# Altium PCB PCB1 p-1.PcbDoc
Units mil, origin at the board's own origin, x right, y up, seen from the top; angles counter-clockwise.
Board outline 1800 x 1800 mil, 2 copper layers (Top Layer, Bottom Layer); 3 components, 3 nets, 6 pads, 0 vias.
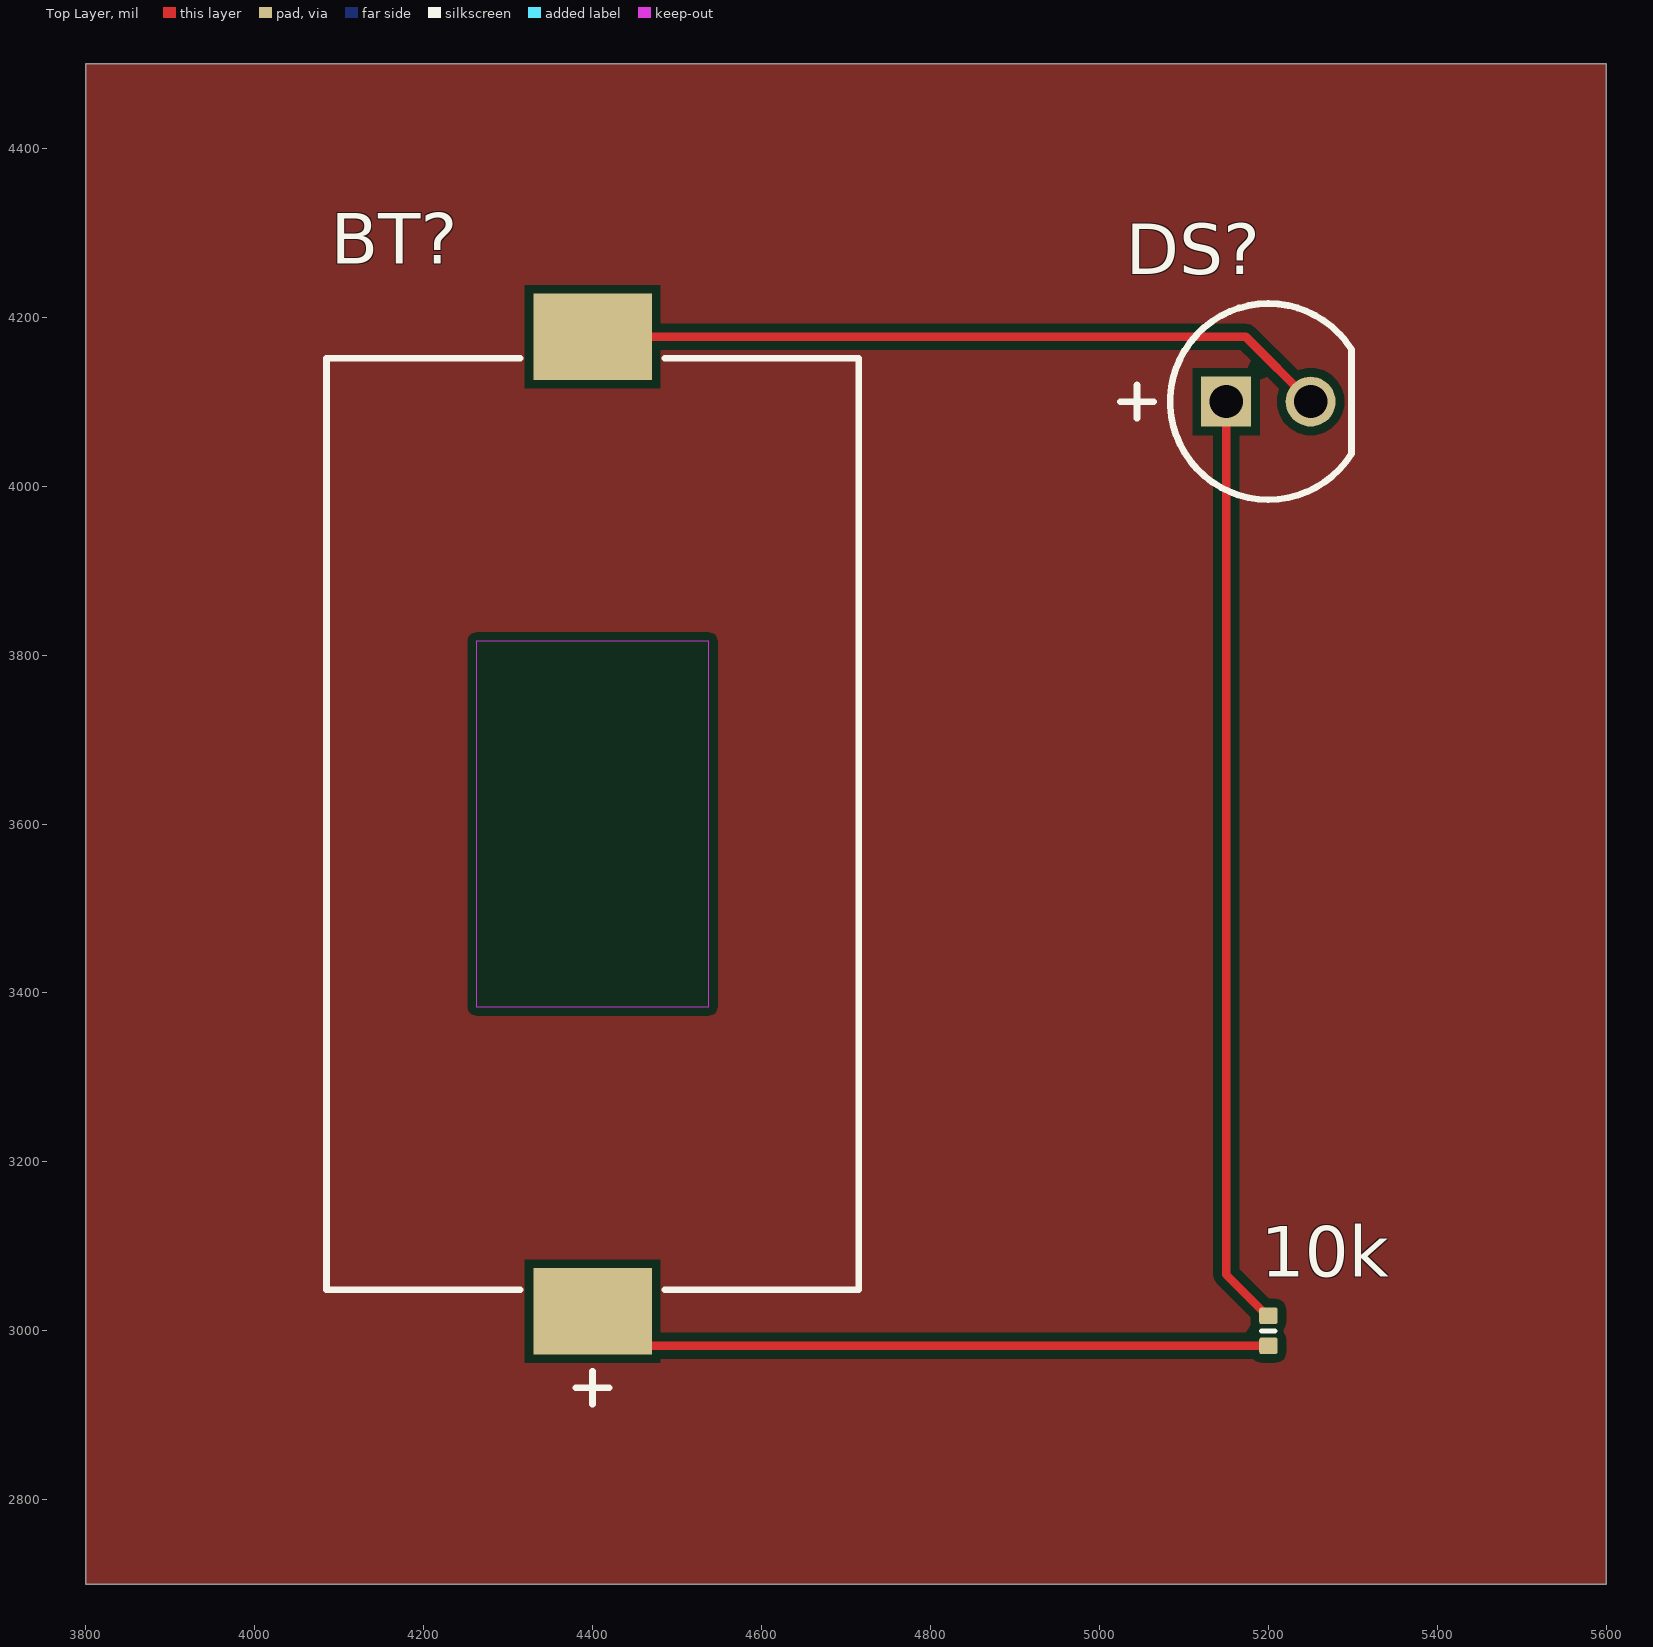
[diagram p0: Top Layer view]
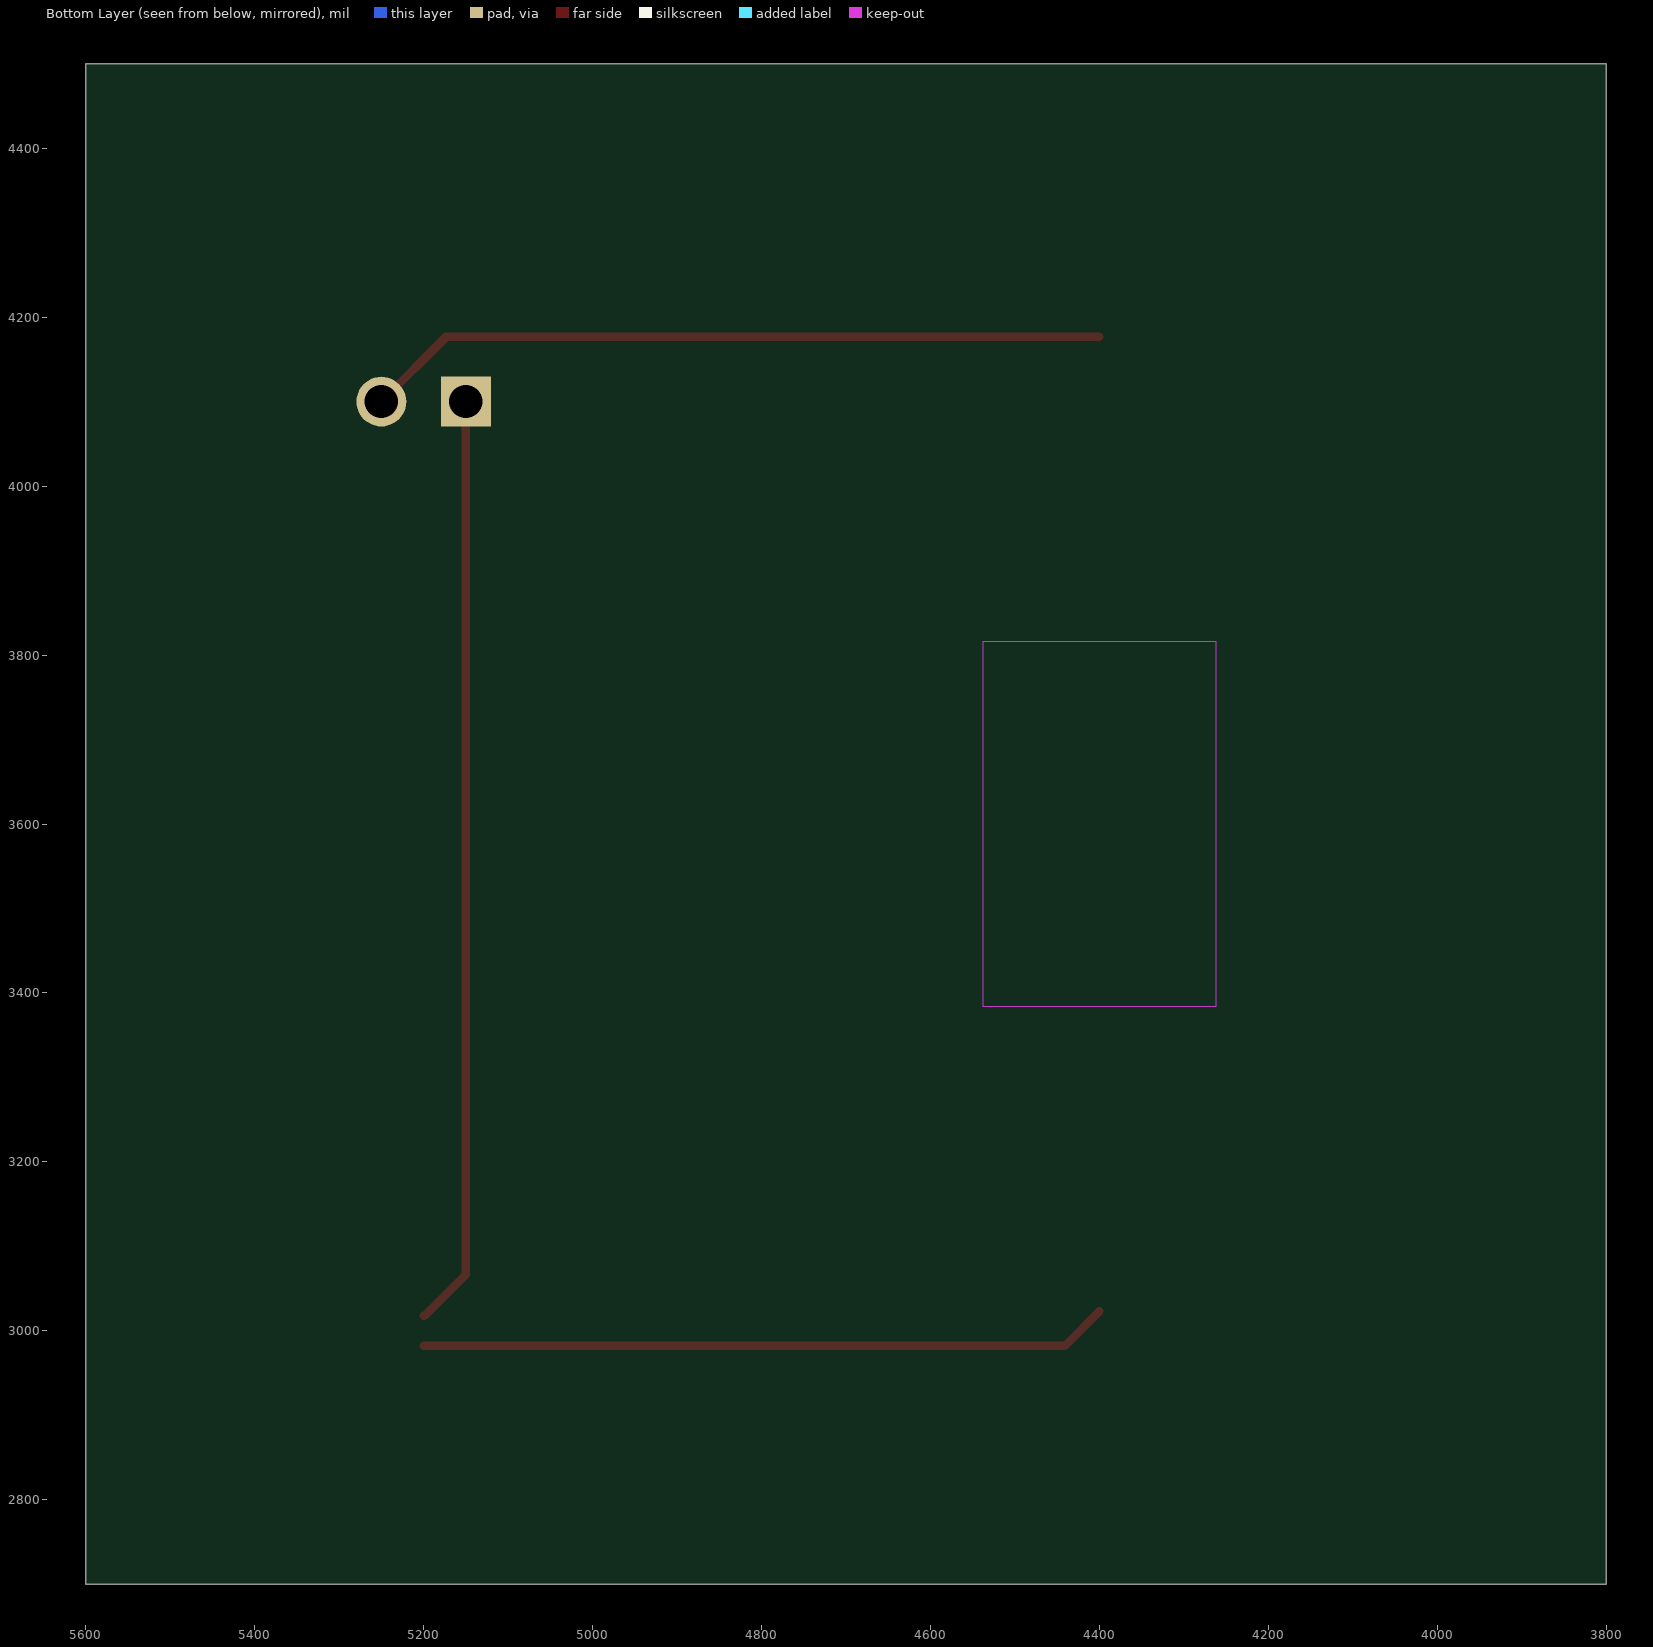
[diagram p1: Bottom Layer view, seen from below]

## Layer stack, top to bottom
Top Solder: solder mask 0.4, Solder Resist, Dk 3.5
Top Layer: signal copper 1.4
Dielectric 1: dielectric 12.6, FR-4, Dk 4.8
Bottom Layer: signal copper 1.4
Bottom Solder: solder mask 0.4, Solder Resist, Dk 3.5

## Board outline
3800,2700 5600,2700 5600,4500 3800,4500

## Design rules (kind name [scope] priority, off if disabled: settings)
Clearance [All] p1: gap=10 ignorepadtopadclearanceinfootprint=FALSE
PolygonConnect [All] p1: connectstyle=Relief reliefconductorwidth=10 reliefentries=4 polygonreliefangle="90 Angle" airgapwidth=10
RoutingVias [All] p1: holewidth=28 width=50 viastyle="Through Hole" minholewidth=28 minwidth=50 maxholewidth=28 maxwidth=50
SolderMaskExpansion [All] p1: expansion=0 istentingtop=FALSE
Width [All] p1: maxlimit=10 minlimit=10 preferedwidth=10
30 further rules are at their usual default settings.

## Components (designator, comment, footprint, x,y, rotation, side; value= is the part's Value field where it differs from the comment)
10k "Resistor 187K +/-1 % 0402 63 mW" RESC0402(1005)_L 5200,3000 r90 top value=187k
BT? "BA2032SM" MPD-BA2032SM_V 4400,3600 r90 top
DS? "G502DC" CGX-G502DC 5200,4100 r0 top

## Footprints (in the part's own frame and the unit in brackets; to place one, negate y for a bottom-side part, rotate by r counter-clockwise, add the part's x,y. Pads: shape width x height; smd on the part's side, far side on the other; paste and mask are expansions set on the pad)
CGX-G502DC [mm] "THD, 2-Leads, Dia 5.9mm, Pin Spacing 2.54mm"
  rect 1.5x1.5 hole 1: 1(-1.27,0)
  round 1.5 hole 1: 2(1.27,0)
  silkscreen extent -4.45,-2.95 2.5,2.95, body extent -2.95,-2.95 2.5,2.95, height 9.1
MPD-BA2032SM_V [mm] "Coin Cell Holder, 2-Leads, Body 28x16mm"
  rect 2.6x3.56 smd: 1(-14.65,0) 2(14.65,0)
  Keep-Out Layer region: -5.5,-3.5 5.5,-3.5 5.5,3.5 -5.5,3.5
  silkscreen extent -17.45,-8 14,8, body extent -14,-8 14,8, height 6.7
RESC0402(1005)_L [mm] "Chip Resistor, Body 1.0x0.5mm, IPC High Density"
  rrect25% 0.5x0.55 smd: 1(-0.45,0) 2(0.45,0)
  silkscreen extent 0,-0.2 0,0.2, body extent -0.5,-0.25 0.5,0.25, height 0.3

## Part data
10k: library part CMP-009-00170-3, "Chip Resistor, 187 kOhms, +/-1 %, 63 mW, -55 to 155 degC, 0402", Case/Package=0402, Max Operating Temperature=155°C, Min Operating Temperature=-55°C, Power=63mW, Tolerance=1%, Pins=2
BT?: library part CMP-002-00003-2, "Coin Cell Holder, 1 Cell, -40 to 225 degC, 2-Pin SMD, RoHS, Tray", Manufacturer="Memory Protection Devices", Max Operating Temperature=225°C, Min Operating Temperature=-40°C, Package Description="2-Pin Surface Mount Device, Body 28 x 16 mm", Package Quantity=100, Case/Package=BA2032SM, Connector Type=BatteryHolder, Datasheet URL=http://www.onlinecomponents.com/datasheet/ba2032sm.aspx?p=11910700, Datasheet Version="Rev. H, 03/2014", Mounting Technology=SM, Package Reference=BA2032SM, RoHS Compliant=True
DS?: library part CMP-007-00008-2, "Green LED, 80 mW, 20 mA, -25 to 85 degC, 2-Pin THD", Manufacturer="Shenzhen CGX", Package Description="2-Pin Through Hole Device, Dia 5.9 mm", Case/Package=G502DC, Datasheet URL=http://datasheet.octopart.com/G502DC-Chengguangxing-datasheet-62330340.pdf, Datasheet Version=Sep-14, Manufacturer URL=http://szcgx.com/, Mounting Technology=TH, Package Reference=G502DC, RoHS Compliant=Unknown

## Nets (pads, with @x,y where several pads share a name; then routed paths per layer and width w, separated by ;. In a path a pad name is that pad's centre, name@x,y a point inside that pad or via, vN(x,y) a via of type N, cw(c..) or ccw(c..) an arc to the next point about the centre after c; other vN are vias at no path point)
Net10k_1: 10k.1 BT?.1 | length 817
  Top Layer w10: BT?.1 4440.94,2982.28 10k.1
Net10k_2: 10k.2 DS?.1 | length 1103.6
  Top Layer w10: DS?.1 5150,3066.73 5199.02,3017.72 10k.2
NetBT?_2: BT?.2 DS?.2 | length 881.8
  Top Layer w10: BT?.2 5173.23,4176.77 DS?.2

## Polygon pours and split planes (outlines as drawn)
no net on Top Layer "NONET_L01_P000" (solid, pour order 0): 3800,4500 5600,4500 5600,2700 3800,2700